# Altium PCB LSS-P-PCB-T v3.4.PcbDoc (part 5 of 6)
Units mil, origin at the board's own origin, x right, y up, seen from the top; angles counter-clockwise.
Board outline 2795.28 x 2795.28 mil, 4 copper layers (Top Layer, Power, Ground, Bottom Layer), stack 62.08 mil thick; 165 components, 120 nets, 586 pads, 623 vias.
Unrouted connection lines stored in the file: 2.
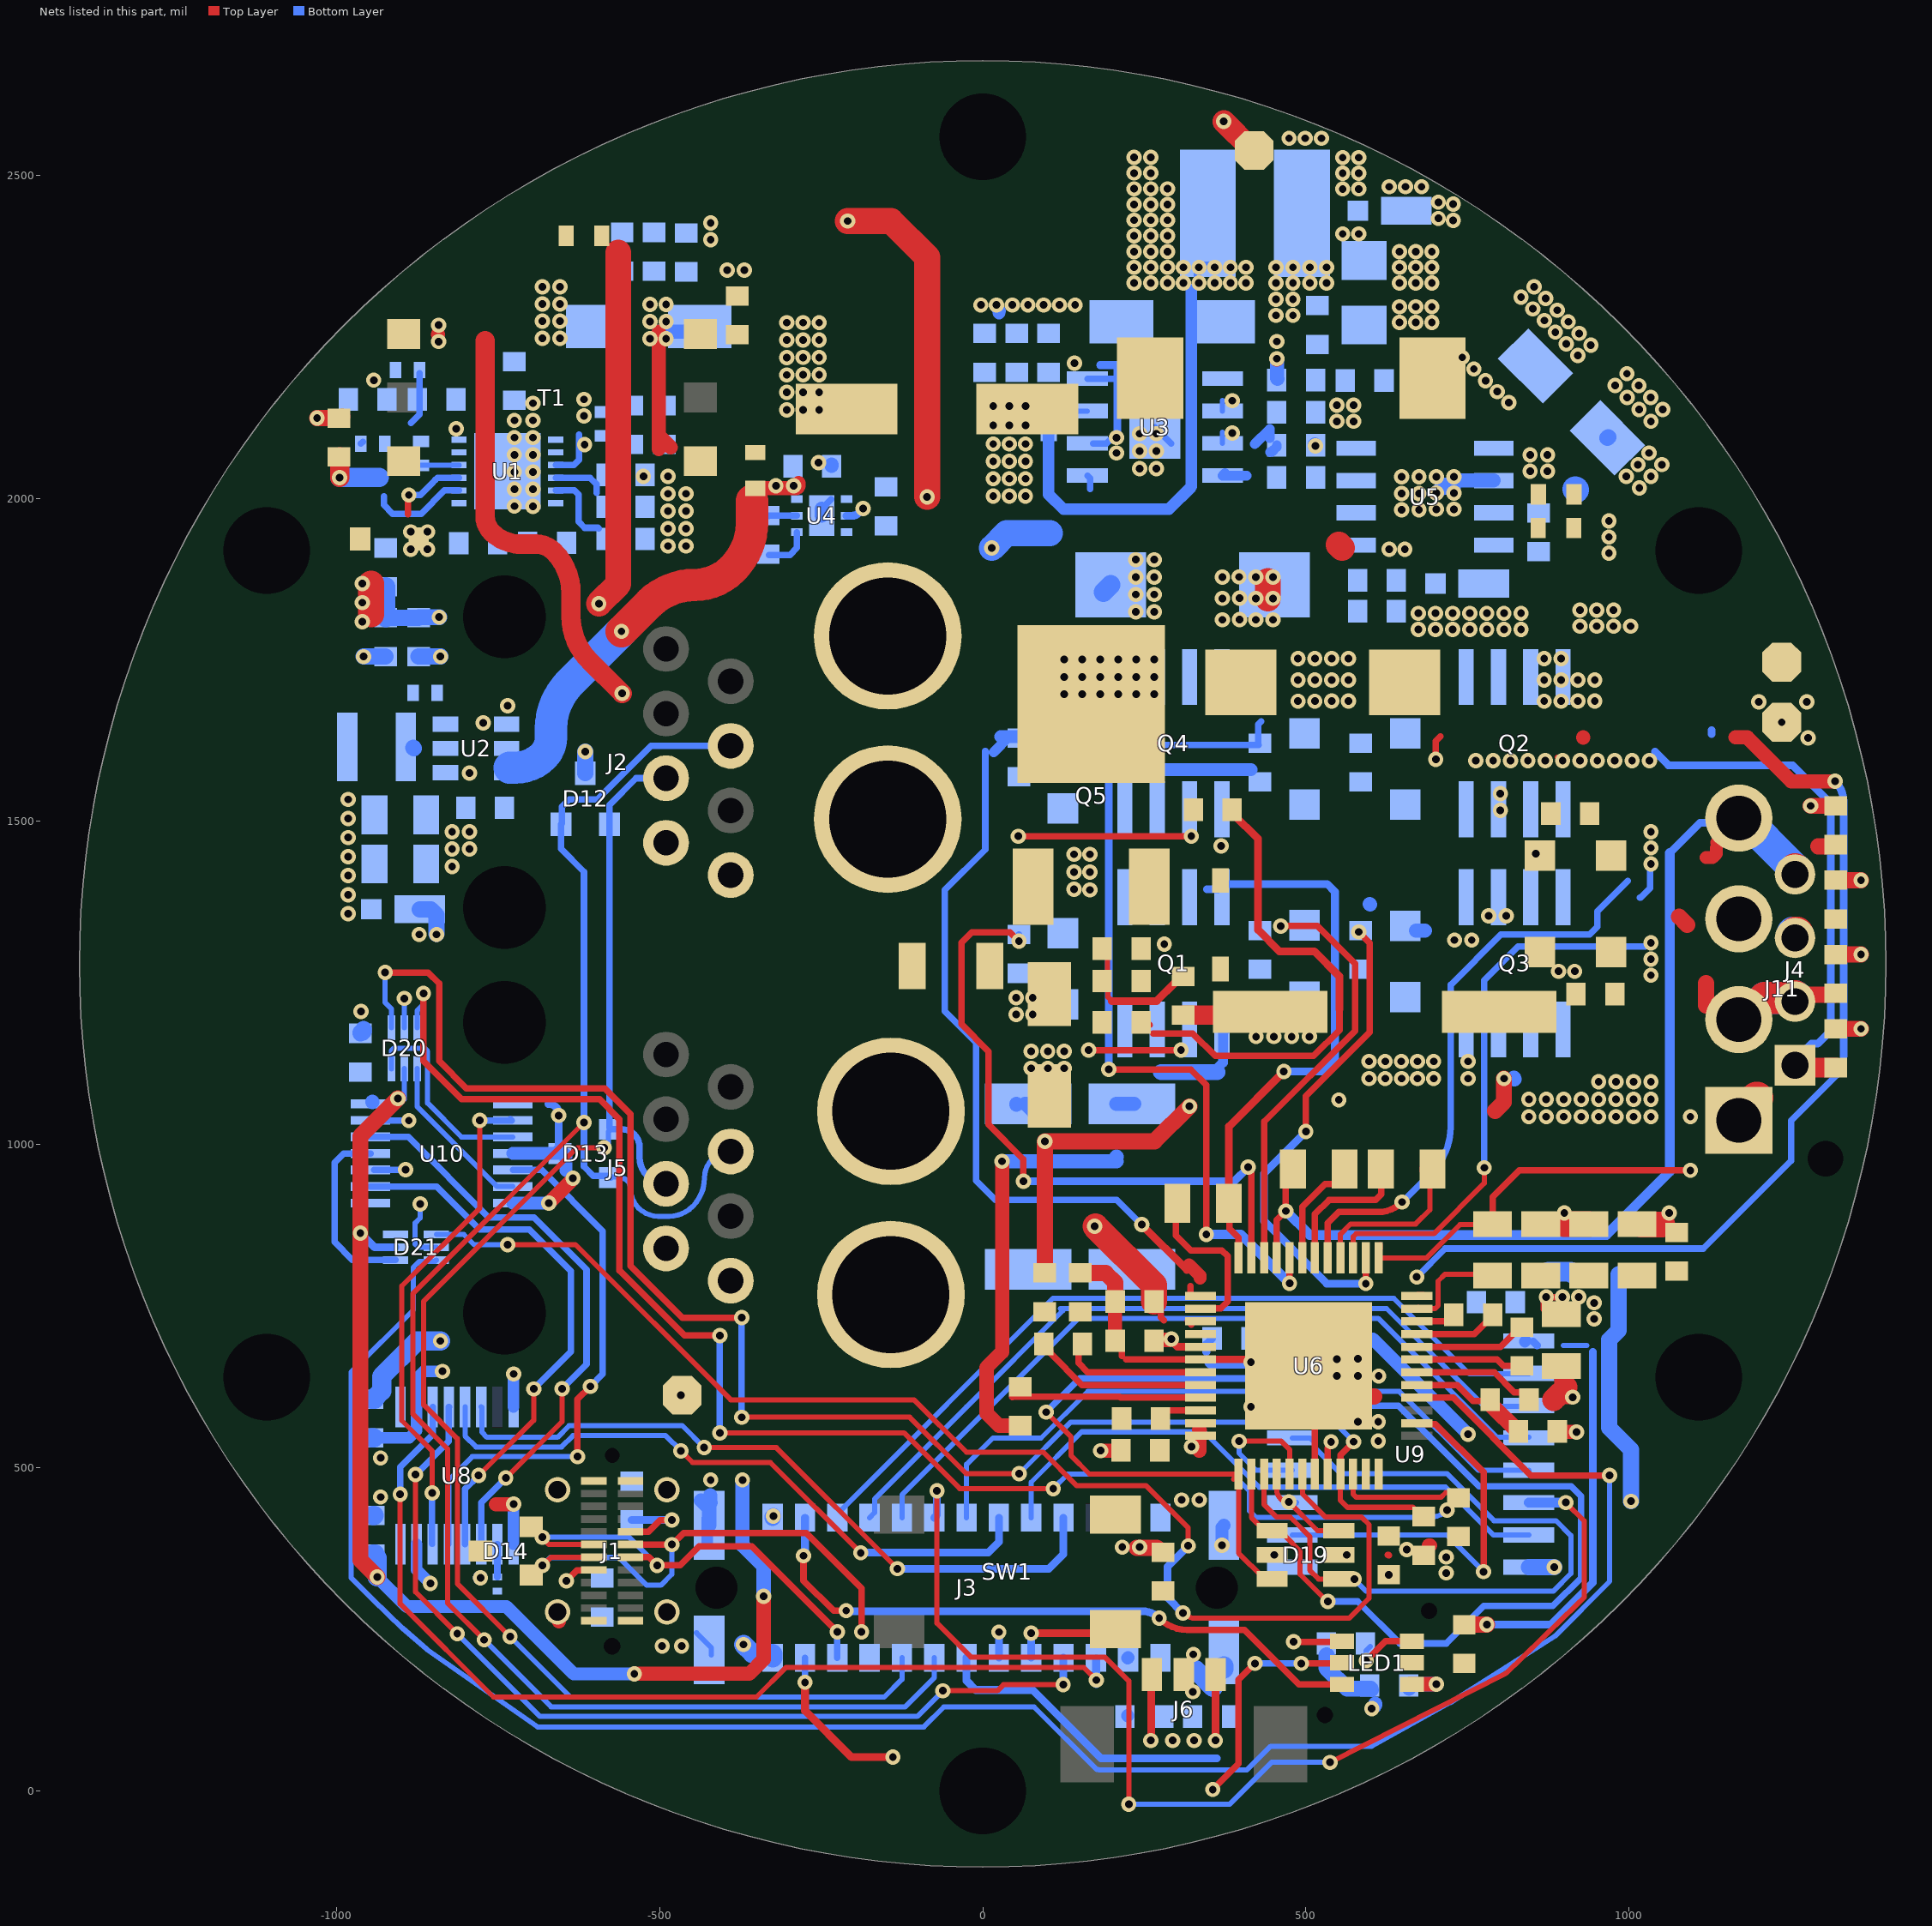
[diagram p4: the nets of this part, all layers, seen from the top]

## Via types
v1: diameter 23.62, hole 11.81, Top Layer to Bottom Layer, 616 vias
v2: diameter 23.62, hole 11.81, Top Layer to Bottom Layer, tented both sides, 7 vias

## Nets (pads, with @x,y where several pads share a name; then routed paths per layer and width w, separated by ;. In a path a pad name is that pad's centre, name@x,y a point inside that pad or via, vN(x,y) a via of type N, cw(c..) or ccw(c..) an arc to the next point about the centre after c; other vN are vias at no path point) (continued)
VS: (continued)
  other v1: 946,730 946,755 897,764.19 922,764.19 845,1043 872,1043 899,1043 926,1043 953,1043 980,1043 1007,1043 1034,1043 845,1070 872,1070 899,1070 926,1070 953,1070 980,1070 1007,1070 1034,1070 953,1097 980,1097 1007,1097 1034,1097 487.83,1686 513.92,1686 540.01,1686.1 566.1,1686.1 868.74,1686 894.82,1686 920.91,1686.1 947,1686.1 126.29,1696.6 154,1696.6 182,1696.6 209.71,1696.6 237.71,1696.6 265.43,1696.6 487.83,1718.9 513.92,1718.9 540.01,1718.9 566.1,1718.9 868.74,1718.9 894.82,1718.9 920.91,1718.9 947,1718.9 126.29,1723.52 154,1723.52 182,1723.52 209.71,1723.52 237.71,1723.52 265.43,1723.52 126.29,1750.44 154,1750.44 182,1750.44 209.71,1750.44 237.71,1750.44 265.43,1750.44 487.83,1751.81 513.92,1751.81 540.01,1751.81 566.1,1751.81 868.74,1751.81 894.82,1751.81 16.24,2003.24 41.16,2003.24 66.08,2003.24 16.24,2030.16 41.16,2030.16 66.08,2030.16 16.24,2057.08 41.16,2057.08 66.08,2057.08 207,2070 16.24,2084 41.16,2084 66.08,2084 207,2093.83 16.24,2112.92 41.16,2112.92 66.08,2112.92 16.24,2142.84 41.16,2142.84 66.08,2142.84 142,2209
VS###: C62.2 D15.1 F1.1 Q5.3 R21.1
  other v1: 51.61,1201.09 77.23,1201.09 51.61,1227.09 77.23,1227.09 141.26,1394.84 166,1394 141.26,1421.5 166,1421.5 141.26,1449 166,1449
pads on no net: J1.A2 J1.A3 J1.A4 J1.A8 J1.A9 J1.A10 J1.A11 J1.B2 J1.B3 J1.B4 J1.B8 J1.B9 J1.B10 J1.B11 J1.MH1 J1.MH2 J2.1 J2.2 J2.3 J2.6 J2.MH1 J2.MH2 J3.B11 J3.MH1 J3.MH2 J5.1 J5.2 J5.3 J5.6 J5.MH1 J5.MH2 J6.MP1 J6.MP2 J11.20 LED1. SW1.2 SW1.4 T1.2 T1.5 U6.25 U6.27 U8.7